# Altium PCB PCB.PcbDoc (part 3 of 9)
Units mil, origin at the board's own origin, x right, y up, seen from the top; angles counter-clockwise.
Board outline 4330.71 x 3149.61 mil, 8 copper layers (L1_TOP, L2_GND, L3_SIG, L4_PWR, L5_PWR, L6_SIG, L7_GND, L8_BOT), stack 62.406 mil thick; 660 components, 433 nets, 2602 pads, 1254 vias.
Unrouted connection lines stored in the file: 930.
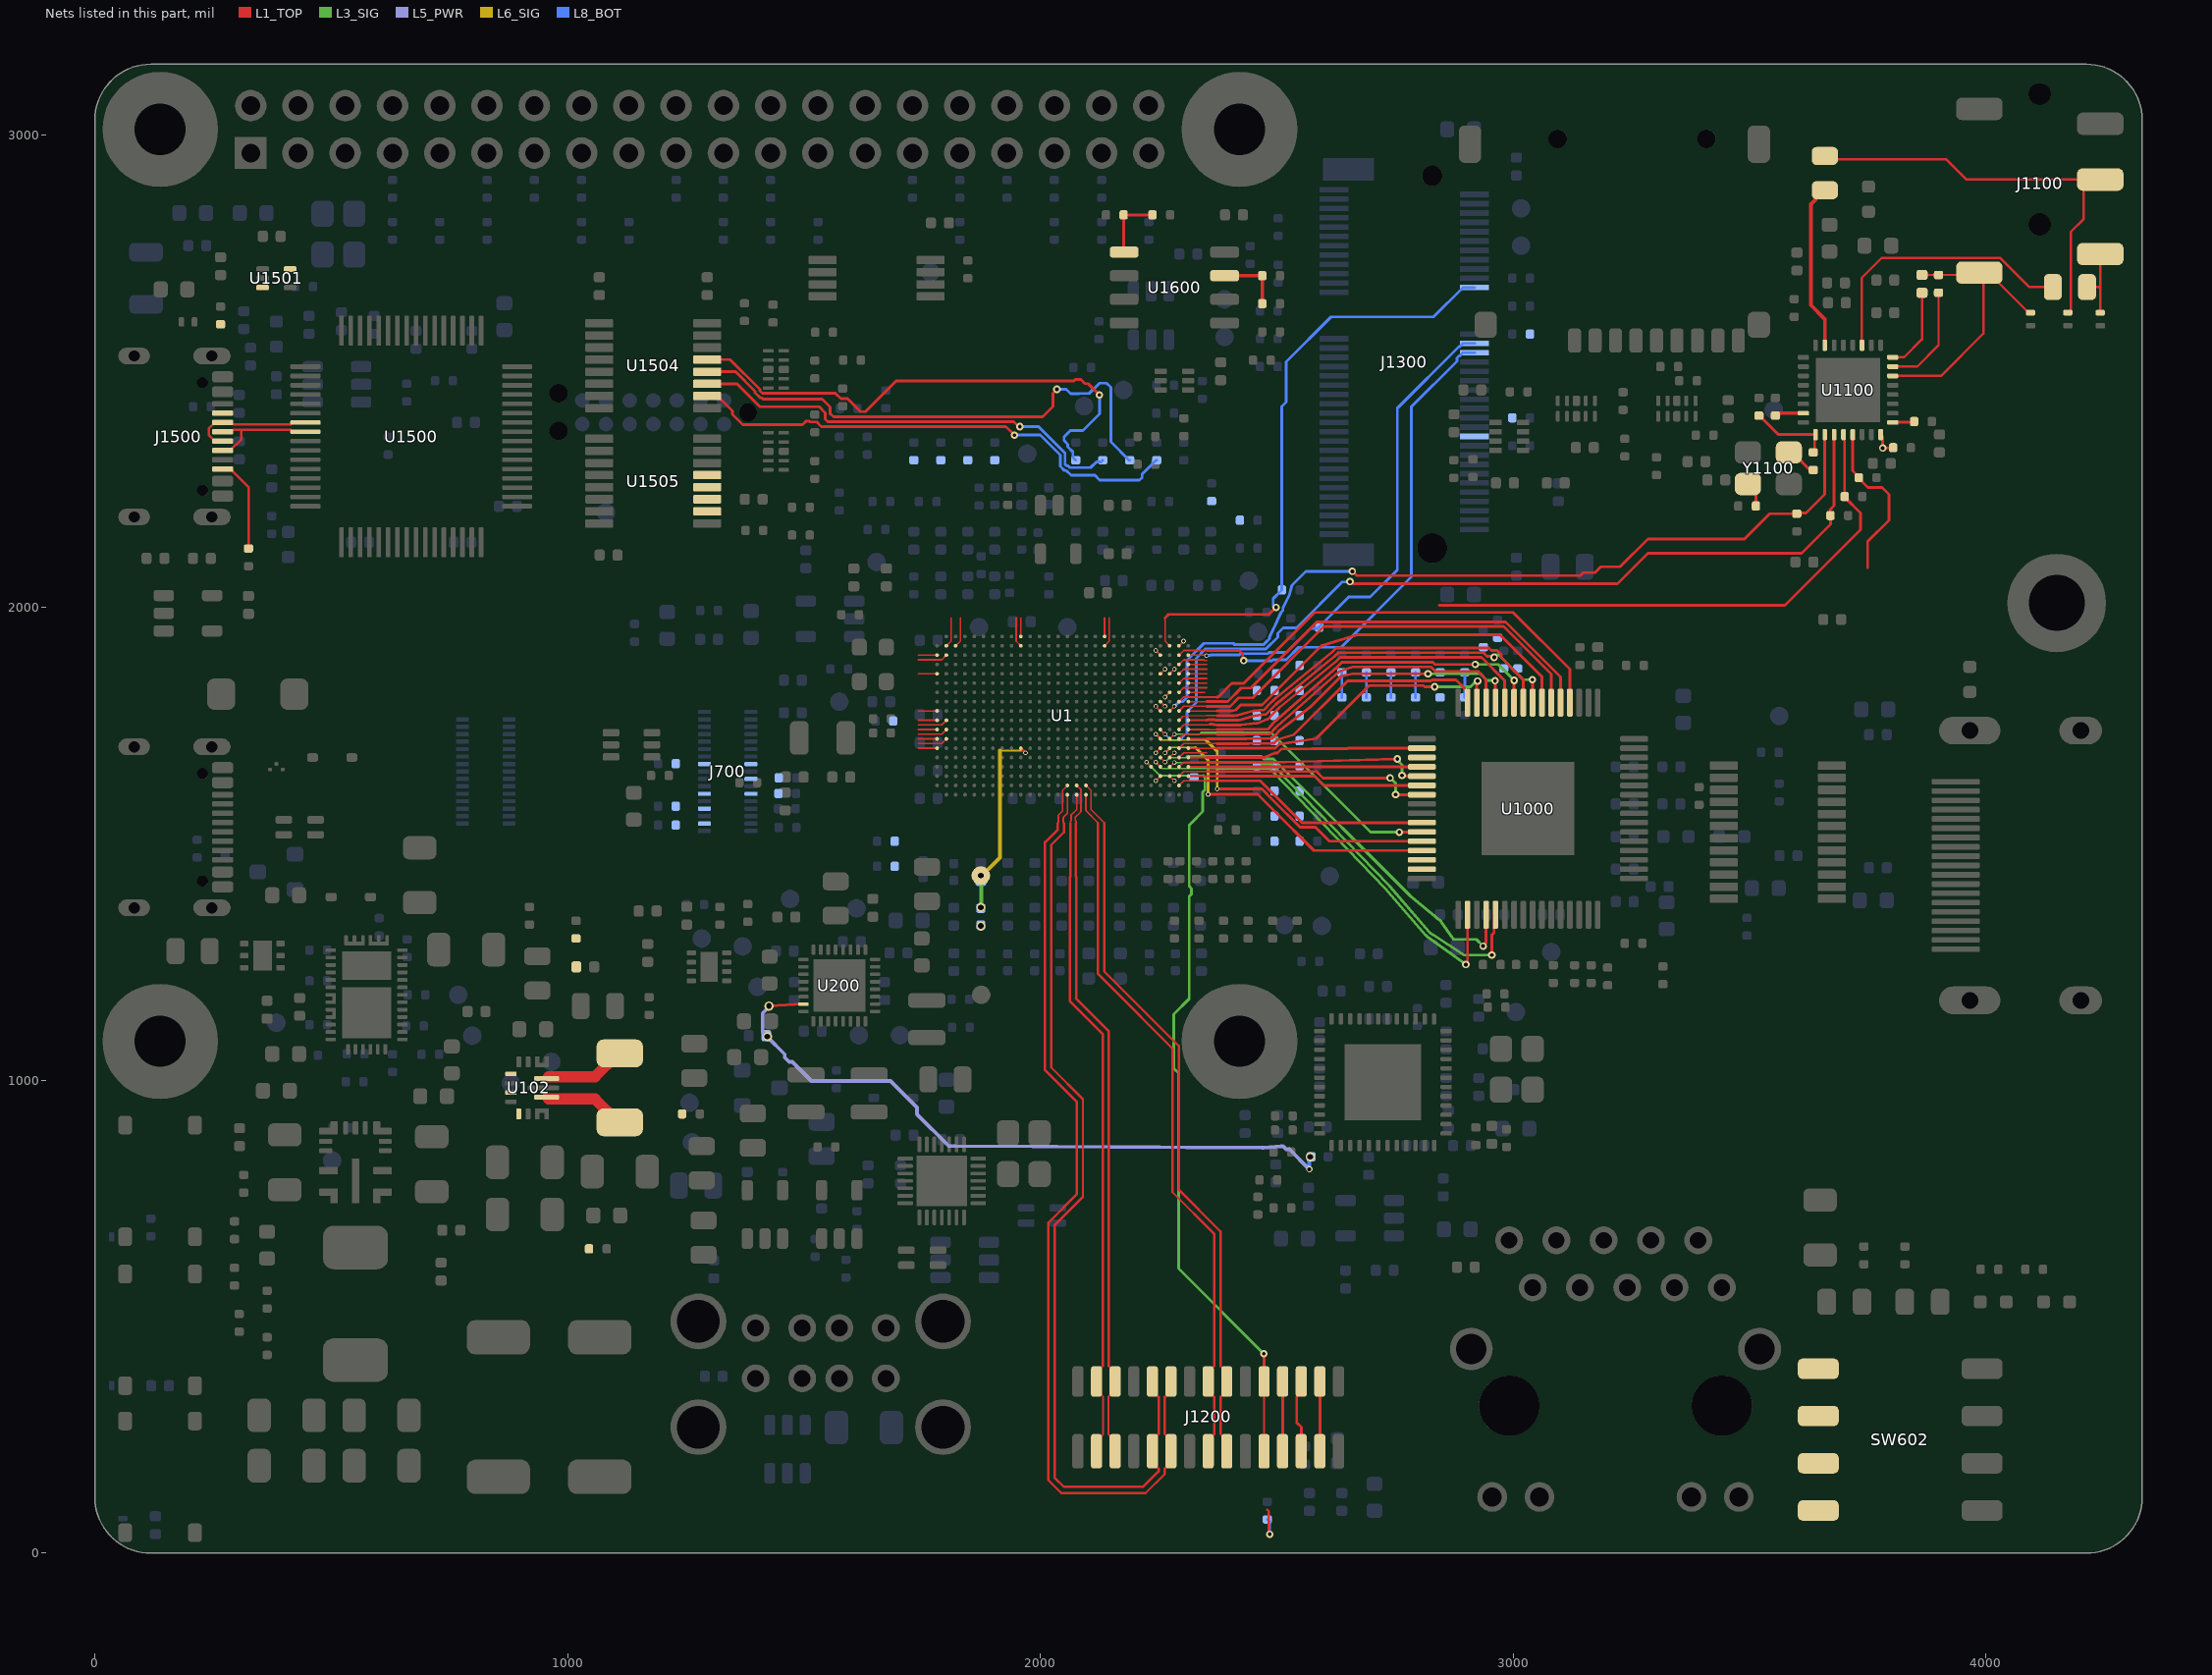
[diagram p7: the nets of this part, all layers, seen from the top]

## Footprints (in the part's own frame and the unit in brackets; to place one, negate y for a bottom-side part, rotate by r counter-clockwise, add the part's x,y. Pads: shape width x height; smd on the part's side, far side on the other; paste and mask are expansions set on the pad) (continued)
WQFN38_REF_4X6 [mm] "TI REF0038A WQFN-38 6x4 mm, 0.4 mm pitch, GND + DRAIN thermal pads (TPS25730D)"
  rrect50% 0.55x0.2 smd: 1(-2.925,1) 2(-2.925,0.6) 3(-2.925,0.2) 4(-2.925,-0.2) 5(-2.925,-0.6) 6(-2.925,-1) 20(2.925,-1.1) 21(2.925,-0.65) 22(2.925,-0.2) 23(2.925,0.2) 24(2.925,0.65) 25(2.925,1.1)
  rrect50% 0.2x0.55 smd: 7(-2.4,-1.925) 8(-2,-1.925) 9(-1.6,-1.925) 10(-1.2,-1.925) 11(-0.8,-1.925) 12(-0.4,-1.925) 13(0,-1.925) 14(0.4,-1.925) 15(0.8,-1.925) 16(1.2,-1.925) 17(1.6,-1.925) 18(2,-1.925) 19(2.4,-1.925) 26(2.4,1.925) 27(2,1.925) 28(1.6,1.925) 29(1.2,1.925) 30(0.8,1.925) 31(0.4,1.925) 32(0,1.925) 33(-0.4,1.925) 34(-0.8,1.925) 35(-1.2,1.925) 36(-1.6,1.925) 37(-2,1.925) 38(-2.4,1.925)
  rrect50% 0.2x1.1 smd: 21(2.75,-0.65) 24(2.75,0.65)
  rrect50% 0.6x0.2 smd: 32(-0.2,1.75) 34(-1,1.75)
  rect 2.72x2.65 smd: 39(-0.965,0)
  rect 1.53x2.65 smd: 40(1.56,0)
  silkscreen extent -3.72,-2 3,2
WSON6_DRV_2X2 [mm] "TI DRV0006A WSON-6 2x2 mm, 0.65 mm pitch, 1.0x1.6 mm thermal pad (TVS2200)"
  rrect33% 0.45x0.3 smd: 1(-0.975,0.65) 2(-0.975,0) 3(-0.975,-0.65) 4(0.975,-0.65) 5(0.975,0) 6(0.975,0.65)
  rect 1x1.6 smd: 7(0,0)
  silkscreen extent -1.72,0.55 -1.52,0.75
WSON8_DSG_2X2 [mm] "TI DSG0008A WSON-8 2x2 mm, 0.5 mm pitch, 0.9x1.6 mm thermal pad (TPS22965)"
  rrect40% 0.5x0.25 smd: 1(-0.95,0.75) 2(-0.95,0.25) 3(-0.95,-0.25) 4(-0.95,-0.75) 5(0.95,-0.75) 6(0.95,-0.25) 7(0.95,0.25) 8(0.95,0.75)
  rect 0.9x1.6 smd: 9(0,0)
  silkscreen extent -1.72,0.65 -1.52,0.85
X1SON2_DPY [mm] "X1SON-2 1.0x0.6 mm (TI DPY0002A), bidirectional, 0.3 x 0.5 mm pads"
  rrect50% 0.3x0.5 smd: 1(-0.35,0) 2(0.35,0)
X2SON3_DMX [mm] "X2SON-3 0.6x1.0 mm (TI DMX0003A), 0.2 mm square pads"
  rrect50% 0.2x0.2 smd: 1(-0.15,0) 2(0.15,-0.34) 3(0.15,0.34)
  silkscreen extent -0.82,-0.1 -0.62,0.1
XTAL_3225_4P [mm] "Crystal 3.2x2.5 mm 4-pad (YXC YSX321SL), 1/3 crystal, 2/4 GND, YXC suggested land"
  rrect50% 1.2x1.4 smd: 1(-0.85,1.1) 2(-0.85,-1.1) 3(0.85,-1.1) 4(0.85,1.1)
  silkscreen extent -1.97,1 -1.77,1.2
XTAL_EPSON_FC-135 [mm] "Epson FC-135 32.768 kHz crystal 3.2x1.5 mm, Epson recommended land"
  rrect50% 1x1.8 smd: 1(-1.25,0) 2(1.25,0)
  silkscreen extent -0.48,-0.75 0.48,0.75

## Part data
C100: library part CAP, "Capacitor, non-polarized", Manufacturer=Samsung, MPN=CL21A475KAQNNNE, Spec="4.7uF 25V X5R 0805 (CVBUS; total VBUS C must stay <= 10 uF)"
C101 C110 C112 C123: library part CAP, "Capacitor, non-polarized", Manufacturer=YAGEO, MPN=CC0603KRX7R9BB104
  C101: Spec="100nF 50V X7R 0603 (VBUS HF)"
  C110: Spec="100nF 50V X7R 0603 (VIN1/PGND1 HF)"
  C112: Spec="100nF 50V X7R 0603 (VIN2/PGND2 HF)"
  C123: Spec="100nF 50V X7R 0603 (VIN HF, at pins)"
C102 C103 C113 C114 C115 C116 C124 C200 C201 C202 C203 C204 C205 C206 C207 C208 C209 C210 C211 C212 C213 C214 C215 C216 C217 C218 C219 C220 C221 C222 C223 C224 C225 C226 C227 C228 C300 C301 C302 C303 C304 C305 C306 C307 C308 C309 C310 C311 C312 C313 C314 C315 C316 C317 C318 C319 C320 C321 C322 C323 C324 C325 C326 C327 C328 C329 C330 C331 C332 C333 C334 C335 C339 C358 C359 C360 C600 C601 C602 C603 C604 C605 C606 C607 C608 C609 C700 C701 C702 C703 C704 C705 C710 C711 C712 C713 C714 C715 C800 C801 C802 C803 C804 C805 C806 C807 C808 C809 C810 C811 C812 C813 C814 C815 C816 C817 C818 C819 C820 C821 C822 C823 C824 C825 C826 C830 C831 C900 C902 C903 C913 C1000 C1001 C1002 C1003 C1004 C1005 C1006 C1007 C1008 C1009 C1010 C1011 C1012 C1013 C1014 C1015 C1016 C1017 C1018 C1019 C1020 C1100 C1101 C1102 C1103 C1104 C1105 C1106 C1107 C1108 C1109 C1110 C1111 C1112 C1113 C1114 C1115 C1200 C1201 C1202 C1203 C1301 C1303 C1404 C1405 C1406 C1407 C1500 C1501 C1502 C1503 C1504 C1505 C1506 C1507 C1508 C1509 C1510 C1511 C1512 C1513 C1514 C1515 C1516 C1517 C1518 C1519 C1520 C1521 C1522 C1523 C1524 C1525 C1600 C1601: library part CAP, "Capacitor, non-polarized"
  C102 C103: Spec="330pF 50V C0G 0402 (CCCy)"
  C113: Spec="1uF 25V X5R 0402 (VCC)"
  C114: Spec="100nF 16V X7R 0402 (at BIAS pin)"
  C115: Spec="100nF 16V X7R 0402 (CBOOT)"
  C116: Spec="4.7pF 50V C0G 0402 (CFF)"
  C124: Spec="100nF 16V X7R 0402 (VAUX)"
  C200: Spec="4.7uF 10V X5R 0603 (PVIN_B1)"
  C201: Spec="100nF 16V X7R 0402 (PVIN_B1)"
  C202: Spec="4.7uF 10V X5R 0603 (PVIN_B2)"
  C203: Spec="4.7uF 10V X5R 0603 (PVIN_B3)"
  C204: Spec="2.2uF 10V X5R 0402 (VSYS)"
  C205: Spec="2.2uF 10V X5R 0402 (PVIN_LDO1)"
  C206: Spec="2.2uF 10V X5R 0402 (PVIN_LDO2)"
  C207: Spec="4.7uF 10V X5R 0603 (PVIN_LDO34)"
  C208: Spec="2.2uF 10V X5R 0402 (VDD1P8, no load)"
  C209: Spec="22uF 6.3V X5R 0805 (bulk)"
  C210 C211: Spec="22uF 6.3V X5R 0805 (Buck1 out)"
  C212 C213: Spec="22uF 6.3V X5R 0805 (Buck2 out)"
  C214 C215: Spec="22uF 6.3V X5R 0805 (Buck3 out)"
  C216: Spec="2.2uF 10V X5R 0402 (LDO1 out)"
  C217: Spec="2.2uF 10V X5R 0402 (LDO2 out, unused)"
  C218: Spec="2.2uF 10V X5R 0402 (LDO3 out)"
  C219: Spec="2.2uF 10V X5R 0402 (LDO4 out)"
  C220: Spec="47pF 50V C0G 0402"
  C221: Spec="220pF 50V C0G 0402 (CT: IO supply slew)"
  C222: Spec="2.2uF 10V X5R 0402 (VIN)"
  C223: Spec="10uF 10V X5R 0603 (VOUT)"
  C224: Spec="100nF 16V X7R 0402 (VOUT)"
  C225: DNP=1, Spec="1uF 10V X5R 0402 (VPP LDO in, DNP)"
  C226: DNP=1, Spec="2.2uF 10V X5R 0402 (VPP LDO out, DNP)"
  C227: Spec="1uF 10V X5R 0402 (PHY LDO in)"
  C228: Spec="1uF 10V X5R 0402 (PHY LDO out)"
  C300: Spec="22pF 50V C0G 0402 (C1)"
  C301: Spec="10uF 10V X5R 0603"
  C302 C303 C304 C305 C306 C307 C309 C311 C314 C315 C316 C317 C318 C319 C320 C321 C323 C325 C327 C329 C331 C333 C335 C1501: Spec="100nF 16V X7R 0402"
  C308 C310 C330 C332: Spec="4.7uF 10V X5R 0402"
  C312: Spec="4.7uF 10V X5R 0402 (VDD_CANUART ball)"
  C313: Spec="100nF 16V X7R 0402 (VDD_CANUART ball)"
  C322 C324 C326 C328 C334: Spec="1uF 10V X5R 0402"
  C339: Spec="100nF 16V X7R 0402 (VDDA_3P3_USB)"
  C358 C359: DNP=1, Spec="1uF 10V X5R 0402 (VPP, DNP)"
  C360: DNP=1, Spec="100nF 16V X7R 0402 (VPP, DNP)"
  C600: Spec="10nF 50V X7R 0402 (osc VDD)"
  C601: Spec="1uF 10V X5R 0402 (osc VDD)"
  C602: Spec="18pF 50V C0G 0402 (Cf1)"
  C603: Spec="18pF 50V C0G 0402 (Cf2)"
  C604: Spec="100nF 16V X7R 0402 (U601 VCC)"
  C605: Spec="22pF 50V C0G 0402 (glitch filter at ball D6)"
  C606 C607: Spec="100nF 16V X7R 0402 (debounce)"
  C608: Spec="100nF 16V X7R 0402 (U602 VCC)"
  C609: Spec="22pF 50V C0G 0402 (glitch filter at ball D17)"
  C700: Spec="10uF 10V X5R 0603 (VCC)"
  C701: Spec="100nF 16V X7R 0402 (VCC)"
  C702: Spec="4.7uF 10V X5R 0603 (VCCQ)"
  C703: Spec="100nF 16V X7R 0402 (VCCQ pin 20)"
  C704: Spec="100nF 16V X7R 0402 (VCCQ pin 21)"
  C705: Spec="100nF 16V X7R 0402 (U703 VCC)"
  C710: Spec="1uF 25V X5R 0402 (VIN1)"
  C711: Spec="1uF 25V X5R 0402 (VIN2)"
  C712: Spec="100nF 16V X7R 0402 (VBIAS)"
  C713: Spec="2.2uF 10V X5R 0402 (card VDD)"
  C714: Spec="100nF 16V X7R 0402 (card VDD)"
  C715: Spec="100nF 16V X7R 0402 (VOUT2)"
  C800 C801: Spec="15pF 50V C0G 0402"
  C802: DNP=1, Spec="22pF 50V C0G 0402 (DNP, SK compliance option)"
  C803: Spec="10uF 10V X5R 0603 (VDDIO bulk)"
  C804: Spec="10nF 25V X7R 0402 (VDDIO bulk)"
  C805: Spec="1uF 25V X5R 0402 (pin 19)"
  C806: Spec="100nF 16V X7R 0402 (pin 19)"
  C807: Spec="1uF 25V X5R 0402 (pin 30)"
  C808: Spec="100nF 16V X7R 0402 (pin 30)"
  C809: Spec="1uF 25V X5R 0402 (pin 41)"
  C810: Spec="100nF 16V X7R 0402 (pin 41)"
  C811: Spec="10uF 10V X5R 0603 (VDDA2P5 bulk)"
  C812: Spec="10nF 25V X7R 0402 (VDDA2P5 bulk)"
  C813: Spec="1uF 25V X5R 0402 (pin 3)"
  C814: Spec="100nF 16V X7R 0402 (pin 3)"
  C815: Spec="1uF 25V X5R 0402 (pin 9)"
  C816: Spec="100nF 16V X7R 0402 (pin 9)"
  C817: Spec="10uF 10V X5R 0603 (VDD1P0 bulk)"
  C818: Spec="10nF 25V X7R 0402 (VDD1P0 bulk)"
  C819: Spec="1uF 25V X5R 0402 (pin 6)"
  C820: Spec="100nF 16V X7R 0402 (pin 6)"
  C821: Spec="1uF 25V X5R 0402 (pin 24)"
  C822: Spec="100nF 16V X7R 0402 (pin 24)"
  C823: Spec="1uF 25V X5R 0402 (pin 31)"
  C824: Spec="100nF 16V X7R 0402 (pin 31)"
  C825: Spec="1uF 25V X5R 0402 (pin 42)"
  C826: Spec="100nF 16V X7R 0402 (pin 42)"
  C830: Spec="100nF 16V X7R 0402 (centre tap)"
  C831: DNP=1, Spec="1nF 2kV X7R 1206 (DNP, AC-coupled shield option)"
  C900: Spec="1uF 10V X5R 0402 (V5 pin 26)"
  C902: Spec="10uF 10V X5R 0603 (VDD33 pin 28)"
  C903: Spec="1uF 10V X5R 0402 (VDD33 pin 28)"
  C913: DNP=1, Spec="4.7nF 2kV X7R 1206 DNP (SK C372 option)"
  C1000: Spec="10uF 10V X5R 0603 (DVDD pins 1/12/33)"
  C1001 C1002 C1003 C1004: Spec="100nF 16V X7R 0402 (DVDD pins 1/12/33)"
  C1005: Spec="10uF 10V X5R 0603 (PVDD pin 18)"
  C1006 C1007 C1008 C1009: Spec="100nF 16V X7R 0402 (PVDD pin 18)"
  C1010: Spec="10uF 10V X5R 0603 (TVDD pins 23/29)"
  C1011 C1012 C1013 C1014: Spec="100nF 16V X7R 0402 (TVDD pins 23/29)"
  C1015: Spec="100nF 16V X7R 0402 (TPD VCCA)"
  C1016: Spec="10uF 10V X5R 0603 (TPD VCCA bulk, SK)"
  C1017: Spec="100nF 16V X7R 0402 (TPD VCC5V)"
  C1018: Spec="10uF 10V X5R 0603 (TPD VCC5V bulk, SK)"
  C1019: Spec="100nF 16V X7R 0402 (5V_OUT)"
  C1020: Spec="10uF 10V X5R 0603 (5V_OUT bulk, SK)"
  C1100: Spec="10uF 10V X5R 0603 (bulk after bead)"
  C1101: Spec="100nF 16V X7R 0402 (AVDD pin 25)"
  C1102: Spec="1uF 16V X5R 0402 (AVDD pin 25)"
  C1103: Spec="100nF 16V X7R 0402 (DRVDD pin 18)"
  C1104: Spec="100nF 16V X7R 0402 (DRVDD pin 24)"
  C1105: Spec="1uF 16V X5R 0402 (DRVDD)"
  C1106: Spec="10uF 10V X5R 0603 (DRVDD)"
  C1107: Spec="100nF 16V X7R 0402 (IOVDD pin 7)"
  C1108: Spec="1uF 16V X5R 0402 (IOVDD pin 7)"
  C1109: Spec="100nF 16V X7R 0402 (DVDD pin 32)"
  C1110: Spec="1uF 16V X5R 0402 (DVDD pin 32)"
  C1111: Spec="47uF 6.3V X5R 0805 (HP L coupling)"
  C1112: Spec="47uF 6.3V X5R 0805 (HP R coupling)"
  C1113: Spec="0.47uF 16V X7R 0402 (mic AC coupling)"
  C1114: Spec="100nF 16V X7R 0402 (Y1100 VDD)"
  C1115: Spec="1uF 16V X5R 0402 (Y1100 VDD)"
  C1200: Spec="10uF 10V X5R 0603 (bulk at J1200, SK C43)"
  C1201: Spec="1uF 16V X5R 0402"
  C1202: Spec="100nF 16V X7R 0402 (at pin 15, SK C45)"
  C1203: Spec="100nF 16V X7R 0402 (bead input)"
  C1301: Spec="10uF 10V X5R 0603 (pins 2/4)"
  C1303: Spec="10uF 10V X5R 0603 (pins 72/74)"
  C1404: DNP=1, Spec="100nF 16V X7R 0402 (EEPROM, DNP)"
  C1405: Spec="10uF 10V X5R 0603 (header 5V)"
  C1406: Spec="10uF 10V X5R 0603 (header 3V3)"
  C1407: Spec="100nF 16V X7R 0402 (header 3V3)"
  C1500: Spec="4.7uF 10V X5R 0603 (VBUS; total <= 10uF)"
  C1502: Spec="100nF 16V X7R 0402 (TPD2E001 VCC)"
  C1503: Spec="1uF 10V X5R 0402 (LDO in)"
  C1504: Spec="2.2uF 10V X5R 0402 (LDO out)"
  C1505: Spec="100nF 16V X7R 0402 (LDO out)"
  C1506: Spec="10uF 10V X5R 0603 (VREGOUT, >= 3.3uF effective)"
  C1507: Spec="100nF 16V X7R 0402 (VCORE 12)"
  C1508: Spec="100nF 16V X7R 0402 (VCORE 37)"
  C1509: Spec="100nF 16V X7R 0402 (VCORE 64)"
  C1510: Spec="100nF 16V X7R 0402 (VREGIN)"
  C1511: Spec="100nF 16V X7R 0402 (VCCIO 20)"
  C1512: Spec="100nF 16V X7R 0402 (VCCIO 31)"
  C1513: Spec="100nF 16V X7R 0402 (VCCIO 42)"
  C1514: Spec="100nF 16V X7R 0402 (VCCIO 56)"
  C1515: Spec="4.7uF 10V X5R 0402 (VPHY)"
  C1516: Spec="100nF 16V X7R 0402 (VPHY)"
  C1517: Spec="4.7uF 10V X5R 0402 (VPLL)"
  C1518: Spec="100nF 16V X7R 0402 (VPLL)"
  C1519 C1520: Spec="33pF 50V C0G 0402 (CL 20pF crystal)"
  C1521: Spec="100nF 16V X7R 0402 (EEPROM)"
  C1522: Spec="100nF 16V X7R 0402 (U1504 VCCA)"
  C1523: Spec="100nF 16V X7R 0402 (U1504 VCCB)"
  C1524: Spec="100nF 16V X7R 0402 (U1505 VCCA)"
  C1525: Spec="100nF 16V X7R 0402 (U1505 VCCB)"
  C1600: Spec="100nF 16V X7R 0402 (U1600 VCC)"
  C1601: Spec="10nF 50V X7R 0402 (U1601 V+, DS 7.3)"
C104 C105 C106 C128: library part CAP, "Capacitor, non-polarized", Manufacturer=Samsung, MPN=CL10A106KP8NNNC
  C104: Spec="10uF 10V X5R 0603 (CVIN_3V3)"
  C105: Spec="10uF 10V X5R 0603 (CLDO_3V3 5-25uF)"
  C106: Spec="10uF 10V X5R 0603 (CLDO_1V5 4.5-12uF)"
  C128: Spec="10uF 10V X5R 0603 (VOUT bypass at pins)"
C107 C108 C125 C126 C127: library part CAP, "Capacitor, non-polarized", Manufacturer=Samsung, MPN=CL31A226KAHNNNE
  C107 C108: Spec="22uF 25V X5R 1206 (CPPHV bulk)"
  C125 C126 C127: Spec="22uF 25V X5R 1206 (COUT)"
C109 C111: library part CAP, "Capacitor, non-polarized", Manufacturer=Samsung, MPN=CL31A106KBHNNNE
  C109: Spec="10uF 50V X5R 1206 (VIN1/PGND1)"
  C111: Spec="10uF 50V X5R 1206 (VIN2/PGND2)"
C117 C118 C119 C120: library part CAP, "Capacitor, non-polarized", Manufacturer=Samsung, MPN=CL31A476MPHNNNE, Spec="47uF 10V X5R 1206 (COUT)"
C121 C122: library part CAP, "Capacitor, non-polarized", Manufacturer=Samsung, MPN=CL21A106KAYNNNE, Spec="10uF 25V X5R 0805 (CIN)"
C901 C904 C906 C908 C910 C912 C1302 C1304 C1305: library part CAP, "Capacitor, non-polarized", LCSC=C1525, Manufacturer=Samsung, MPN=CL05B104KO5NNNC
  C901: Spec="100nF 16V X7R 0402 (V5 pin 26)"
  C904: Spec="100nF 16V X7R 0402 (VDD33 pin 28)"
  C906 C910: Spec="100nF 16V X7R 0402 (switch IN)"
  C908 C912: Spec="100nF 16V X7R 0402 (at connector)"
  C1302: Spec="100nF 16V X7R 0402 (pins 2/4)"
  C1304: Spec="100nF 16V X7R 0402 (pins 72/74)"
  C1305: Spec="100nF 16V X7R 0402 (pin 64)"
C905 C909: library part CAP, "Capacitor, non-polarized", LCSC=C15850, Manufacturer=Samsung, MPN=CL21A106KAYNNNE, Spec="10uF 25V X5R 0805 (switch IN)"
C907 C911: library part CAP_POL, "Capacitor, polarized (pin 1 = +)", LCSC=C48970647, Manufacturer="Honor Elec", MPN=RYHV10V150UF6*5, Spec="150uF 10V polymer (USB 2.0 >= 120 uF)"
C1300: library part CAP, "Capacitor, non-polarized", LCSC=C45783, Manufacturer=Samsung, MPN=CL21A226MAQNNNE, Spec="22uF 25V X5R 0805 (bulk)"
C1400 C1401 C1402 C1403: library part CAP, "Capacitor, non-polarized", Manufacturer=FH, MPN=0402CG470J500NT, Spec="47pF 50V C0G 0402 (I2C slew limiter)"
D100: library part TVS2200_DRV, "TVS2200 22 V flat-clamp surge protection, WSON-6 2x2", Manufacturer="Texas Instruments", MPN=TVS2200DRVR
D101 D102: library part TVS_BI, "Bidirectional TVS / ESD diode", Manufacturer=Nexperia, MPN=PESD24VL1BA,115
  D101: Spec="PESD24VL1BA CC1 ESD (11pF)"
  D102: Spec="PESD24VL1BA CC2 ESD (11pF)"
D103: library part DIODE, "Diode (pin 1 = anode)", Manufacturer=MDD, MPN=SS34, Spec="SS34 40V 3A Schottky (TPS25730 DS 8.5)"
D200: library part TVS_BI, "Bidirectional TVS / ESD diode", Spec="TPD1E10B06 ESD"
D600 D601 D1100 D1101 D1102 D1500: library part TVS_BI, "Bidirectional TVS / ESD diode", Manufacturer="Texas Instruments", MPN=TPD1E10B06DPYR
  D1100: Spec="TPD1E10B06DPYR (tip, at J1100)"
  D1101: Spec="TPD1E10B06DPYR (ring 1, at J1100)"
  D1102: Spec="TPD1E10B06DPYR (sleeve, at J1100)"
D900: library part ESD122_DMX, "ESD122 2-channel 0.2 pF bidirectional ESD diode, X2SON-3 (DMX)", LCSC=C544474, Manufacturer="Texas Instruments", MPN=ESD122DMXR
D901 D903: library part BZX84_SOT23, "Zener diode SOT-23 (1 = anode, 2 = NC, 3 = cathode)", LCSC=C12746, Manufacturer=LRC, MPN=LBZX84C6V8LT1G, Spec="LBZX84C6V8LT1G 6.8V"
D902: library part DIODE, "Diode (pin 1 = anode)", LCSC=C124205, Manufacturer="Diodes Inc", MPN=BAT54WS-7-F, Spec="BAT54WS-7-F (anode at hub)"
D904 D905: "USBLC6-2 2-line USB ESD array with VBUS clamp, SOT23-6L", LCSC=C7519, Manufacturer=STMicroelectronics, MPN=USBLC6-2SC6
F1400: library part PTC_BSMD1206, "PTC resettable fuse, 1206, not polarized", Manufacturer=BHFUSE, MPN=BSMD1206-110-6V
FB300 FB301 FB302 FB303 FB304 FB305 FB306 FB307 FB308 FB309 FB310 FB311: library part FERRITE, "Ferrite bead"
  FB300 FB301: Spec="BLM18SG260TN1D 26R@100MHz 6A"
  FB302 FB303 FB304 FB305 FB306 FB307 FB308 FB309: Spec="BLM15PX121SN1D 120R@100MHz 2A"
  FB310: Spec="BLM15PX121SN1D 120R@100MHz 2A (VDDS_OSC0, 25 MHz osc, PORz gate)"
  FB311: Spec="BLM15PX121SN1D 120R@100MHz 2A (62_POWER_4 group 5)"
FB800 FB1000 FB1001 FB1002 FB1003 FB1100 FB1200 FB1500 FB1501: library part FERRITE, "Ferrite bead", Manufacturer=Murata
  FB800: MPN=BLM15PX121SN1D, Spec="BLM15PX121SN1D 120R@100MHz 2A"
  FB1000: MPN=BLM18KG601SN1D, Spec="BLM18KG601SN1D 600R@100MHz 1.3A 0603 (DVDD)"
  FB1001: MPN=BLM18KG601SN1D, Spec="BLM18KG601SN1D 600R@100MHz 1.3A 0603 (PVDD)"
  FB1002: MPN=BLM18KG601SN1D, Spec="BLM18KG601SN1D 600R@100MHz 1.3A 0603 (TVDD)"
  FB1003: MPN=BLM18PG121SN1D, Spec="BLM18PG121SN1D 120R@100MHz 0603 (shell to GND, SK FL17)"
  FB1100: MPN=BLM18KG601SN1D, Spec="BLM18KG601SN1D 600R@100MHz 1.3A 0603 (codec analog 3.3 V)"
  FB1200: MPN=BLM18KG601SN1D, Spec="BLM18KG601SN1D 600R@100MHz 1.3A 0603 (camera 3.3 V)"
  FB1500: MPN=BLM18PG121SN1D, Spec="BLM18PG121SN1D 120R@100MHz (VPHY)"
  FB1501: MPN=BLM18PG121SN1D, Spec="BLM18PG121SN1D 120R@100MHz (VPLL)"
H1300: library part MOUNTING_HOLE, "Plated mounting hole (pin to GND)", LCSC=C22431324, Manufacturer="Wurth Elektronik", MPN=9774015243R
H1600 H1601 H1602 H1603: library part MOUNTING_HOLE, "Plated mounting hole (pin to GND)"
J100: "USB Type-C receptacle, USB 2.0 16-contact, SMD R/A, 4 THT shell pegs", Manufacturer="Korean Hroparts Elec", MPN=TYPE-C-31-M-12
J700: library part GB042-34P-H10, "eMMC-module connector, LS Mtron GB042 34-pin 0.4 mm B2B plug (Odroid/Radxa/PINE64 pinout)", Manufacturer="LS Mtron", MPN=GB042-34P-H10-E3000, Supplier="broker, consigned to JLC (STOCK RISK)"
J701: library part GB042-30P-H10, "eMMC-module retention connector, LS Mtron GB042 30-pin 0.4 mm B2B plug (mechanical, all GND)", Manufacturer="LS Mtron", MPN=GB042-30P-H10-E3000, DNP=1
J702: "microSD push-push socket with card-detect switch (Hroparts TF-01A)", LCSC=C91145, Manufacturer="Korean Hroparts Elec", MPN=TF-01A
J800: "RJ45 MagJack, 1000BASE-T 1CT:1CT magnetics, green/yellow LEDs, shielded (HanRun HR911130A)", LCSC=C54408, Manufacturer=HanRun, MPN=HR911130A
J900: library part BX-TYPE-A-MWC44, "Dual stacked USB 2.0 Type-A receptacle, THT right angle (Bossie BX-TYPE-A-MWC44)", Manufacturer="Wurth Elektronik", MPN=61400826021, Supplier="Mouser 710-61400826021"
J1000: library part HDMI_A_RECEPT, "HDMI type-A receptacle, 19 pin + shell (XFCN HDMI-A-19F-S-D)", Manufacturer=XFCN, MPN=HDMI-A-19F-S-D
J1100: library part JACK_TRRS_PJ320DB, "3.5 mm TRRS jack, SMD, no switch (PJ-320DB-5A)", Manufacturer="Korean Hroparts Elec", MPN=PJ-320DB-5A
J1200: library part FPC15_RPI_CSI, "15-pin 1.0 mm FPC, Raspberry Pi camera pinout (TE 1-1734248-5)", Manufacturer="TE Connectivity", MPN=1-1734248-5
J1300: "M.2 Key-E socket, 67 contacts 0.5 mm, H3.2, 2 SMT tabs (LOTES APCI0085-P002A)", LCSC=C841649, Manufacturer=LOTES, MPN=APCI0085-P002A
J1400: library part HDR_2X20_2541WV, "Pin header 2x20 2.54 mm, Raspberry Pi 40-pin numbering", Manufacturer=HanElectricity, MPN=2541WV-2x20P
J1500: "USB Type-C receptacle, USB 2.0 16-contact, SMD R/A, 4 THT shell pegs", Manufacturer="Korean Hroparts (HRO)", MPN=TYPE-C-31-M-12
J1501: library part TC2070_TI14, "Tag-Connect TC2070-NL footprint, TI 14-pin JTAG pinout (pad 6 = KEY)", Manufacturer=Tag-Connect, MPN=TC2070-NL-FP, DNP=1
L100: library part IND, "Inductor", Manufacturer=Sunlord, MPN=MWSA0603S-4R7MT, Spec="4.7uH MWSA0603S-4R7MT (Isat 9A, 33mOhm)"
L101: library part IND, "Inductor", Manufacturer=Sunlord, MPN=MWSA0402S-1R5MT, Spec="1.5uH MWSA0402S-1R5MT (Isat 5.5A)"
L200 L201 L202: library part IND, "Inductor", Manufacturer=Murata, MPN=DFE252012F-R47M=P2
  L200: Spec="0.47uH DFE252012F-R47M (Buck1, Isat 6.7A)"
  L201: Spec="0.47uH DFE252012F-R47M (Buck2)"
  L202: Spec="0.47uH DFE252012F-R47M (Buck3)"
L900 L901 L902: library part SDCW2012-2, "Sunlord SDCW2012-2 wire-wound 2-line common-mode choke, 0805", LCSC=C54888, Manufacturer=Sunlord, MPN=SDCW2012-2-900TF, Spec="SDCW2012-2-900TF 90R@100MHz"
LED1600 LED1601 LED1602 LED1603: library part LED, "LED (pin 1 = anode)", Manufacturer="Hubei KENTO"
  LED1600: MPN=KT-0805G, Spec="KT-0805G green (3V3)"
  LED1601: MPN=KT-0805G, Spec="KT-0805G green (USER_LED1 heartbeat)"
  LED1602: MPN=KT-0603R, Spec="KT-0603R red (USER_LED2)"
  LED1603: MPN=KT-0603R, Spec="KT-0603R red (VCC_5V0)"
R100 R101 R102 R103 R104 R105 R106 R107 R108 R109 R110 R111 R112 R113 R114 R115 R117 R118 R119 R120 R121 R122 R123 R124 R125 R200 R201 R202 R203 R204 R205 R206 R208 R209 R210 R600 R601 R603 R604 R605 R606 R607 R608 R609 R610 R611 R612 R613 R620 R621 R622 R623 R624 R625 R626 R627 R628 R629 R630 R631 R632 R633 R634 R635 R636 R637 R638 R639 R640 R641 R642 R643 R644 R645 R646 R647 R648 R649 R650 R651 R700 R701 R702 R703 R704 R705 R706 R707 R708 R709 R710 R711 R712 R713 R720 R721 R722 R723 R724 R725 R726 R727 R728 R730 R731 R732 R800 R801 R802 R803 R804 R805 R806 R807 R808 R809 R810 R811 R812 R813 R814 R815 R820 R821 R822 R823 R840 R841 R902 R903 R904 R905 R906 R907 R908 R909 R910 R911 R912 R913 R1000 R1001 R1002 R1003 R1004 R1005 R1006 R1007 R1008 R1009 R1010 R1011 R1012 R1013 R1014 R1015 R1016 R1100 R1101 R1102 R1103 R1104 R1105 R1106 R1107 R1108 R1109 R1110 R1111 R1112 R1200 R1201 R1202 R1312 R1316 R1319 R1428 R1429 R1430 R1431 R1432 R1433 R1500 R1501 R1503 R1504 R1505 R1507 R1508 R1509 R1510 R1511 R1512 R1513 R1514 R1515 R1516 R1517 R1518 R1520 R1521 R1522 R1523 R1524 R1525 R1526 R1527 R1528 R1529 R1600 R1601 R1602 R1603 R1604 R1605 R1606 R1607 R1608 R1609 R1610 R1620 R1621: library part RES, "Resistor"
  R100: Spec="100k 1% 0402 (ADCIN2 up)"
  R101: Spec="4.99k 1% 0402 (ADCIN2 dn: max 9V)"
  R102: Spec="100k 1% 0402 (ADCIN3 up)"
  R103: Spec="4.99k 1% 0402 (ADCIN3 dn: 1.5A op)"
  R104 R105 R106: Spec="10k 1% 0402 (RESERVED)"
  R107: Spec="10k 1% 0402 (FAULT_IN high = no fault)"
  R108: Spec="10k 1% 0402 (SoC-side pull-up)"
  R109 R110 R111 R112: Spec="100k 1% 0402"
  R113: Spec="100k 1% 0402 (RENT)"
  R114: Spec="43.2k 1% 0402 (RENB: UVLO on 4.19V, off 3.0V)"
  R115: Spec="33.2k 1% 0402 (RT: 400kHz)"
  R117: Spec="100k 1% 0402 (RFBT)"
  R118: Spec="43.2k 1% 0402 (RFBB: 3.315V)"
  R119: Spec="1k 1% 0402 (RFF)"
  R120: Spec="100k 1% 0402 (PGOOD pull-up)"
  R121: Spec="100k 1% 0402 (EN: on with 3V3_MAIN)"
  R122: Spec="100k 1% 0402 (PS high: power save)"
  R123: Spec="680k 1% 0402 (R1)"
  R124: Spec="130k 1% 0402 (R2: 4.985V)"
  R125: Spec="100k 1% 0402 (PG pull-up)"
  R200 R202: Spec="10k 0402"
  R201: Spec="2.2k 0402 (fast edge into the MCU_PORz gate, sheet 06)"
  R203: Spec="62R 0402 (slew limiter, SK rev B)"
  R204: Spec="10k 0402 (SD starts at 3.3 V)"
  R205: Spec="10k 0402 (GPO2 is open drain)"
  R206: Spec="100k 0402 (keeps VPP off)"
  R208: Spec="10k 0402 (MODE/STBY high = ACTIVE + forced PWM, SK R621)"
  R209: Spec="10k 0402 (MODE/RESET high = no reset)"
  R210: Spec="10k 0402 (Octavo 62_CONFIG_9: to the VDDSHV_CANUART source)"
  R600: Spec="22R 1% 0402 (series term. at the oscillator)"
  R601: Spec="10k 1% 0402 (OE pull-up, SK R370)"
  R603: DNP=1, Spec="10M 1% 0402 (Rbias option, DS Fig 6-21 gives no value)"
  R604: Spec="10k 1% 0402 (gate enabled with no debugger)"
  R605: Spec="10k 1% 0402 (spare input high)"
  R606: Spec="4.7k 1% 0402 (SK R201; holds PORz low when U601 is unpowered)"
  R607 R608 R904 R912 R1508 R1509 R1510 R1523 R1524 R1525 R1526 R1527: Spec="10k 1% 0402"
  R609: Spec="10k 1% 0402 (Octavo 62_RESET_6)"
  R610: Spec="10k 1% 0402 (Octavo 62_CONFIG_4, 62_RESET_4)"
  R611: Spec="10k 1% 0402 (RESETSTATz pull-down, as SK; SoC load 0.33 mA)"
  R612: Spec="10k 1% 0402 (holds peripherals in reset)"
  R613: Spec="10k 1% 0402 (DS Table 5-74: pull-down)"
  R620: Spec="10k 1% 0402 (B0 = 1: PLL ref 011 = 25 MHz)"
  R621: DNP=1, Spec="10k 1% 0402 DNP (B0 = 1: PLL ref 011 = 25 MHz)"
  R622: Spec="10k 1% 0402 (B1 = 1: PLL ref)"
  R623: DNP=1, Spec="10k 1% 0402 DNP (B1 = 1: PLL ref)"
  R624: DNP=1, Spec="10k 1% 0402 DNP (B2 = 0: PLL ref)"
  R625: Spec="10k 1% 0402 (B2 = 0: PLL ref)"
  R626: DNP=1, Spec="10k 1% 0402 DNP (B7 = 0: MMCSD FS/raw: 0 = FAT)"
  R627: Spec="10k 1% 0402 (B7 = 0: MMCSD FS/raw: 0 = FAT)"
  R628: DNP=1, Spec="10k 1% 0402 DNP (B8 = 0: rsvd for MMCSD)"
  R629: Spec="10k 1% 0402 (B8 = 0: rsvd for MMCSD)"
  R630: Spec="10k 1% 0402 (B9 = 1: MMCSD port: 1 = MMC1 (SD))"
  R631: DNP=1, Spec="10k 1% 0402 DNP (B9 = 1: MMCSD port: 1 = MMC1 (SD))"
  R632: Spec="10k 1% 0402 (B10 = 1: backup 001 = USB)"
  R633: DNP=1, Spec="10k 1% 0402 DNP (B10 = 1: backup 001 = USB)"
  R634: DNP=1, Spec="10k 1% 0402 DNP (B11 = 0: backup)"
  R635: Spec="10k 1% 0402 (B11 = 0: backup)"
  R636: DNP=1, Spec="10k 1% 0402 DNP (B12 = 0: backup)"
  R637: Spec="10k 1% 0402 (B12 = 0: backup)"
  R638: DNP=1, Spec="10k 1% 0402 DNP (B13 = 0: backup USB mode: 0 = DFU)"
  R639: Spec="10k 1% 0402 (B13 = 0: backup USB mode: 0 = DFU)"
  R640: DNP=1, Spec="10k 1% 0402 DNP (B14 = 0: reserved)"
  R641: Spec="10k 1% 0402 (B14 = 0: reserved)"
  R642: DNP=1, Spec="10k 1% 0402 DNP (B15 = 0: reserved)"
  R643: Spec="10k 1% 0402 (B15 = 0: reserved)"
  R644: Spec="1k 1% 0402 (DIP pos 1 ON -> B3 = 1)"
  R645: Spec="47k 1% 0402 (B3 OFF = 0)"
  R646: Spec="1k 1% 0402 (DIP pos 2 ON -> B4 = 1)"
  R647: Spec="47k 1% 0402 (B4 OFF = 0)"
  R648: Spec="1k 1% 0402 (DIP pos 3 ON -> B5 = 1)"
  R649: Spec="47k 1% 0402 (B5 OFF = 0)"
  R650: Spec="1k 1% 0402 (DIP pos 4 ON -> B6 = 0)"
  R651: Spec="47k 1% 0402 (B6 OFF = 1)"
  R700: Spec="22R 0402 (at SoC; 0R option)"
  R701 R702 R703 R704 R705 R706 R707 R708 R709 R723 R724 R725 R726 R727: Spec="47k 0402"
  R710: Spec="10k 0402 (GPIO pull-up: reset follows RESETSTATz by default)"
  R711: Spec="1k 0402 (RST_n link, see note)"
  R712: Spec="10k 0402 (CLK pull-down, at pin 8)"
  R713: Spec="10k 0402 (strobe pull-down)"
  R720: Spec="4.7k 0402 (SD power follows RESETSTATz)"
  R721: Spec="10k 0402 (RT1 rise time)"
  R722: Spec="10k 0402 (RT2 rise time)"
  R728: DNP=1, Spec="47k 0402 (DNP)"
  R730: Spec="100R 0402 (SDCD series)"
  R731: Spec="47k 0402 (SDCD pull-up)"
  R732: Spec="10k 0402 (CLK pull-down, Octavo 62_SD_10)"
  R800 R801 R802 R803 R804 R805: Spec="22R 0402 (at SoC)"
  R806 R807 R808 R809 R810 R811: Spec="22R 0402 (at PHY)"
  R812: Spec="11k 1% 0402 (RBIAS)"
  R813: Spec="2.2k 0402 (MDIO pull-up)"
  R814: Spec="2.2k 0402 (INT open drain)"
  R815: Spec="1.5k 0402 (reset follows RESETSTATz)"
  R820: Spec="5.76k 1% 0402 (Rhi RX_CTRL mode 3)"
  R821: Spec="2.49k 1% 0402 (Rlo RX_CTRL mode 3)"
  R822: Spec="10k 1% 0402 (Rhi LED_1 mode 2)"
  R823: Spec="2.49k 1% 0402 (Rlo LED_1 mode 2)"
  R840: Spec="470R 0402 (green = LED_0 link)"
  R841: Spec="470R 0402 (yellow = LED_1 1000M)"
  R902 R910: Spec="3.48k 1% 0402"
  R903 R911: Spec="16.5k 1% 0402"
  R905: DNP=1, Spec="10k 0402 DNP (device-only port)"
  R906: Spec="1.5k 0402 (holds hub in reset while SoC pads are off)"
  R907: Spec="3.9k 0402 (PGANG low = independent OC)"
  R908 R909: Spec="10k 0402 (TPS2051B OC pull-up)"
  R913: Spec="100k 0402 (keeps USB-A power off while the SoC IO is unpowered; DNP only for USB1 deep-sleep wake)"
  R1000: Spec="22R 0402 (IDCK series, place at SoC ball T26)"
  R1001: Spec="10k 0402 (ISEL=0: I2C off, strap mode)"
  R1002: Spec="10k 0402 (BSEL=1: 24-bit single edge)"
  R1003: Spec="10k 0402 (DSEL=0: don't care at VREF=DVDD)"
  R1004: Spec="10k 0402 (EDGE=0: latch on IDCK falling edge)"
  R1005: Spec="10k 0402 (DKEN=0: de-skew off)"
  R1006: Spec="10k 0402 (TFP410 powered down in reset)"
  R1007: Spec="5.1k 0402 (MSEN open-drain pull-up, DS: 5k)"
  R1008: Spec="510R 1% 0402 (RTFADJ: 500 mV DVI swing)"
  R1009: Spec="10k 0402 (5 V switch + HPD off in reset)"
  R1010: Spec="10k 0402 (DDC level shifter off in reset)"
  R1011: Spec="100k 0402 (defines HPD while CT_HPD = 0)"
  R1012: DNP=1, Spec="10k 0402 DNP (EDGE=1 option; remove R1004)"
  R1013: DNP=1, Spec="10k 0402 DNP (DKEN=1 option; remove R1005)"
  R1014: DNP=1, Spec="10k 0402 DNP (DK3=1)"
  R1015: DNP=1, Spec="10k 0402 DNP (DK2=1)"
  R1016: DNP=1, Spec="10k 0402 DNP (DK1=1)"
  R1100 R1101: Spec="2.2k 0402 (I2C1 pull-up)"
  R1102: Spec="47R 0402 (series, SK R759 practice)"
  R1103: Spec="47R 0402 (series, SK R760 practice)"
  R1104: Spec="22R 0402 (source series, at Y1100)"
  R1105: Spec="2.2k 0402 (MICBIAS feed)"
  R1106: Spec="10k 0402 (OE high = run, SK R425)"
  R1107: Spec="10k 0402 (MCLK pull-down, SK D-note)"
  R1108: Spec="10k 0402 (codec held in reset)"
  R1109 R1110 R1111: Spec="100k 0402 (pad off in SoC reset)"
  R1112: Spec="100k 0402 (codec DOUT Hi-Z in reset)"
  R1200 R1201: Spec="2.2k 0402 (I2C2 pull-up)"
  R1202: Spec="10k 0402 (camera off in reset)"
  R1312: Spec="2.2k 0402 (beats the card's 10k pull-up: 0.33 V)"
  R1316: Spec="33R 0402 (SK R24)"
  R1319: Spec="100k 0402 (VIO_CFG weak pull-up, M.2 3.1.15)"
  R1428 R1429: Spec="1.8k 1% 0402 (RPi I2C1 value)"
  R1430 R1431: Spec="3.9k 1% 0402 (HAT ID bus)"
  R1432: DNP=1, Spec="1k 1% 0402 (WP pull-up, DNP)"
  R1433: Spec="47k 1% 0402 (UART5 RX idle high, Octavo 62_UART_2)"
  R1500 R1501: Spec="5.1k 1% 0402 (Rd, UFP)"
  R1503: Spec="12k 1% 0402 (REF)"
  R1504: Spec="1k 1% 0402 (RESET# pull-up)"
  R1505: Spec="10k 1% 0402 (OE# pull-up)"
  R1507: Spec="2.2k 1% 0402"
  R1511 R1513 R1515 R1517: Spec="10k 1% 0402 (SoC RXD pull-up)"
  R1512 R1514 R1516 R1518: Spec="10k 1% 0402 (SoC TXD pull-up)"
  R1520: Spec="22R 1% 0402 (TDO, near SoC)"
  R1521: Spec="22R 1% 0402 (RTCK loopback)"
  R1522: Spec="100R 1% 0402 (VTref current limit)"
  R1528: Spec="4.7k 1% 0402 (TRSTn pull-down)"
  R1529: DNP=1, Spec="4.7k 0402 DNP (sheet 06 R604 already pulls SRST up)"
  R1600: Spec="10k 1% 0402 (A0 = 1 -> 0x51)"
  R1601: DNP=1, Spec="10k 1% 0402 DNP (fit instead of R1600 for 0x50)"
  R1602: Spec="10k 1% 0402 (WP low = writable, as SK)"
  R1603: DNP=1, Spec="10k 1% 0402 DNP (write-protect: fit instead of R1602)"
  R1604: Spec="10k 1% 0402 (ALERT open drain)"
  R1605: Spec="2.2k 1% 0402 (I2C0 SCL pull-up)"
  R1606: Spec="2.2k 1% 0402 (I2C0 SDA pull-up)"
  R1607: Spec="330R 1% 0402 (power LED)"
  R1608: Spec="330R 1% 0402 (heartbeat, ~1.5 mA)"
  R1609: Spec="1k 1% 0402 (user 2, ~1.3 mA)"
  R1610: Spec="1k 1% 0402 (5 V present, ~3 mA)"
  R1620 R1621: Spec="47R 1% 0402 (series at the SoC ball, SK p.44)"
R301: library part RES, "Resistor", LCSC=C25893, Manufacturer=UNI-ROYAL, MPN=0402WGF4022TCE, Spec="40.2k 1% 0402 (R2)"
R302: library part RES, "Resistor", LCSC=C25902, Manufacturer=UNI-ROYAL, MPN=0402WGF4871TCE, Spec="4.87k 1% 0402 (R1)"
R1305 R1306 R1307 R1308 R1309 R1322 R1323: library part RES, "Resistor", LCSC=C25792, Manufacturer=UNI-ROYAL, MPN=0402WGF4702TCE
  R1305 R1306 R1307 R1308 R1309: Spec="47k 0402 (SDIO pull-up)"
  R1322: Spec="47k 0402 (UART6 RXD pull-up, 62_UART_2)"
  R1323: Spec="47k 0402 (UART6 CTSn pull-up)"
R1310 R1311 R1315 R1317: library part RES, "Resistor", LCSC=C25744, Manufacturer=UNI-ROYAL, MPN=0402WGF1002TCE
  R1310: Spec="10k 0402 (SK R12, clock low while pad is off)"
  R1311: Spec="10k 0402 (card IRQ is open drain, SK R6)"
  R1315: Spec="10k 0402 (W_DISABLE2#: BT off by default)"
  R1317: Spec="10k 0402 (card IRQ_BLE open drain)"
R1400 R1401 R1402 R1403 R1404 R1405 R1406 R1407 R1408 R1409 R1410 R1411 R1412 R1413 R1414 R1415 R1416 R1417 R1418 R1419 R1420 R1421 R1422 R1423: library part RES, "Resistor", Manufacturer=UNI-ROYAL, MPN=0402WGF330JTCE, Spec="33R 1% 0402"
R1424 R1425 R1426 R1427: library part RES, "Resistor", Manufacturer=UNI-ROYAL, MPN=0402WGF620JTCE, Spec="62R 1% 0402 (slew limiter)"
SW200 SW600 SW601: library part TS-1187A, "Tactile switch SPST-NO 5.1x5.1 mm, 4 terminals (A=B, C=D)", Manufacturer="XKB Connection", MPN=TS-1187A-B-A-B
SW602: library part DIPSW4_SMD, "DIP switch 4-position SPST, 2.54 mm SMD (pos k = pins k / 9-k)", Manufacturer="SHOU HAN", MPN="2.54-4P TPGT"
TP100 TP101 TP102 TP103 TP104 TP105 TP200 TP201 TP202 TP203 TP204 TP300 TP301 TP302 TP303 TP304 TP305 TP306 TP307 TP308 TP309 TP310 TP311 TP312 TP600 TP601 TP602 TP603 TP604 TP605 TP606 TP1000 TP1001 TP1300 TP1301 TP1400 TP1500 TP1600 TP1601 TP1602: library part TESTPOINT, "Test point"
U1: "Octavo OSD6254 SiP: TI AM6254 + 1 GB DDR4, 9x14 mm 500-ball 0.5 mm BGA", Manufacturer="Octavo Systems", MPN=OSD6254-1G-IPM
U100: library part TPS25730D_REF, "TPS25730D USB-C PD sink controller, 5 A integrated power path, WQFN-38 REF", Manufacturer="Texas Instruments", MPN=TPS25730DREFR
U101: library part LM61460_RJR, "LM61460 36 V 6 A synchronous buck, adjustable, VQFN-HR-14 RJR", Manufacturer="Texas Instruments", MPN=LM61460AANRJRR
U102: library part TPS63070_RNM, "TPS63070 2-16 V 3.6 A buck-boost, adjustable, VQFN-HR-15 RNM", Manufacturer="Texas Instruments", MPN=TPS63070RNMR
U200: library part TPS65219, "TPS65219 PMIC, 3 bucks + 4 LDOs, VQFN-32 RHB/RSM (NVM per OPN)", Manufacturer="Texas Instruments", MPN=TPS6521904RSMR
U201: library part TPS22965_DSG, "TPS22965 5.7 V 4 A load switch with controlled rise time, WSON-8", Manufacturer="Texas Instruments", MPN=TPS22965DSGR
U202: library part TLV755P_DBV, "TLV755P 500 mA LDO, SOT-23-5 (fixed output per OPN)", Manufacturer="Texas Instruments", MPN=TLV75518PDBVR, DNP=1
U203: library part TLV755P_DBV, "TLV755P 500 mA LDO, SOT-23-5 (fixed output per OPN)", Manufacturer="Texas Instruments", MPN=TLV75710PDBVR
U600: library part ECS-2520MV, "25 MHz HCMOS oscillator 1.6-3.6 V, 2.5x2.0 mm SMD-4", Manufacturer="ECS Inc", MPN=ECS-2520MV-250-CN-TR
U601: library part SN74LVC1G11_DCK, "Single 3-input AND gate, SC70-6", LCSC=C282348, Manufacturer=Nexperia, MPN=74LVC1G11GW,125, Supplier="Mouser 771-LVC1G11GW125"
U602: library part SN74LVC2G17_DBV, "Dual Schmitt-trigger buffer, SOT-23-6", Manufacturer="Texas Instruments", MPN=SN74LVC2G17DBVR
U700: library part TPS22996_DRL, "TPS22996 dual 4 A load switch with QOD and ON-current set rise time, SOT-583-8", Manufacturer="Texas Instruments", MPN=TPS22996DRLR
U701 U702 U1510 U1511: library part TPD4E05U06_DQA, "4-channel 0.5 pF ESD array, USON-10", Manufacturer="Texas Instruments", MPN=TPD4E05U06DQAR
U703: library part SN74LVC1G08_DBV, "Single 2-input AND gate, SOT-23-5", LCSC=C7666, Manufacturer="Texas Instruments", MPN=SN74LVC1G08DBVR
U800: library part DP83867_RGZ, "DP83867IS/E/CS 10/100/1000 Ethernet PHY, RGMII/SGMII, VQFN-48 RGZ", LCSC=C543036, Manufacturer="Texas Instruments", MPN=DP83867ISRGZR
U900: "WCH CH335F USB 2.0 HS 4-port MTT hub, per-port power/OC, QFN-28 4x4", LCSC=C5137013, Manufacturer="WCH (Jiangsu Qin Heng)", MPN=CH335F
U901 U902: library part TPS2051B_DBV, "TPS2051B 0.5 A USB power switch, active-high EN, OC flag, SOT-23-5", LCSC=C24593, Manufacturer="Texas Instruments", MPN=TPS2051BDBVR
U1000: library part TFP410_PAP, "TI TFP410 DVI 1.0 transmitter, 24-bit DPI in, HTQFP-64 PowerPAD", Manufacturer="Texas Instruments", MPN=TFP410PAPR
U1001: library part TPD12S016_PW, "TI TPD12S016 HDMI companion: 5 V load switch, DDC/CEC/HPD level shift, 12-ch ESD, TSSOP-24", Manufacturer="Texas Instruments", MPN=TPD12S016PWR
U1100: library part TLV320AIC3104_RHB, "TI TLV320AIC3104 low-power stereo codec, I2S + I2C, VQFN-32", Manufacturer="Texas Instruments", MPN=TLV320AIC3104IRHBR
U1400: library part BL24C32A_TSSOP8, "BL24C32A 32 Kbit I2C EEPROM (2-byte address), TSSOP-8", Manufacturer="Shanghai Belling", MPN=BL24C32A-SFRC, DNP=1
U1500: library part FT4232HL, "FT4232H quad Hi-Speed USB to UART/MPSSE, LQFP-64", Manufacturer=FTDI, MPN=FT4232HL-REEL
U1501: library part TPD2E001_DRL, "2-channel USB ESD array with VCC clamp rail, SOT-5 (DRL)", Manufacturer="Texas Instruments", MPN=TPD2E001DRLR
U1502: library part AP2112K_SOT25, "AP2112K 600 mA CMOS LDO, fixed output, SOT-23-5", Manufacturer="Diodes Incorporated", MPN=AP2112K-3.3TRG1
U1503: library part 93LC46B_OT, "93LC46B 1 Kbit Microwire EEPROM (64 x 16), SOT-23-6", Manufacturer=Microchip, MPN=93LC46BT-I/OT
U1504 U1505: library part SN74AVC4T245_PW, "Dual 2-bit dual-supply bus transceiver, Ioff + VCC isolation, TSSOP-16", Manufacturer="Texas Instruments", MPN=SN74AVC4T245PWR
U1600: library part AT24C512C_SOIC8, "512 Kbit I2C EEPROM, SOIC-8 (SSHD: 2.5-5.5 V)", Manufacturer=Microchip, MPN=AT24C512C-SSHD-T
U1601: library part TMP102_DRL, "TMP102 digital temperature sensor, I2C, SOT-563", Manufacturer="Texas Instruments", MPN=TMP102AIDRLR
Y600: library part XTAL2, "Crystal, 2-terminal", Manufacturer="Seiko Epson", MPN=Q13FC13500003, Spec="32.768kHz 9pF 20ppm Q13FC13500003"
Y800: library part XTAL4_3225, "Crystal, 3.2x2.5 mm, 4 pads (1/3 crystal, 2/4 case GND)", LCSC=C9006, Manufacturer=YXC, MPN=X322525MOB4SI, Spec="X322525MOB4SI 25MHz 12pF 10ppm"
Y900: library part XTAL_YSX321SL, "Crystal 3.2x2.5 mm 4-pad, YXC YSX321SL (1/3 crystal, 2/4 GND)", Manufacturer="Diodes Incorporated", MPN=FL1200074, Spec="FL1200074 12MHz 20pF 20ppm", Supplier="Digi-Key FL1200074"
Y1100: library part OSC_3225_OE, "LVCMOS oscillator with output enable, 3.2x2.5 mm 4-pad", Manufacturer="KYOCERA AVX", MPN=MC3225Z12.2880C19XSH, Spec="MC3225Z12.2880C19XSH 12.288MHz", Supplier="Digi-Key MC3225Z12.2880C19XSH"
Y1500: library part X322512MSB4SI, "Crystal 3225 4-pad (1/3 crystal, 2/4 case GND)", Manufacturer="Diodes Incorporated", MPN=FL1200074, Spec="12MHz FL1200074", Supplier="Digi-Key FL1200074"

## Via types
v1: diameter 19.68, hole 11.81, L1_TOP to L8_BOT, 865 vias
v2: diameter 9.84, hole 5.91, L1_TOP to L8_BOT, 246 vias
v3: diameter 15.75, hole 7.87, L1_TOP to L8_BOT, 125 vias
v4: diameter 13.78, hole 7.87, L1_TOP to L8_BOT, 18 vias

## Nets (pads, with @x,y where several pads share a name; then routed paths per layer and width w, separated by ;. In a path a pad name is that pad's centre, name@x,y a point inside that pad or via, vN(x,y) a via of type N, cw(c..) or ccw(c..) an arc to the next point about the centre after c; other vN are vias at no path point)
AUD_BCLK: R1109.1 U1.J26 U1100.2 | length 1786.2
  L1_TOP w3.54: U1.J26@2273.62,1781.5 v2(2283.46,1791.34)
  L1_TOP w5.91: v3(2660,2076.77) 2669.69,2067.71 3142.1,2067.71 3148.42,2074.04 3172.96,2074.04 3185.32,2086.4 3226.4,2086.4 3285,2145 3489.33,2145 3543.03,2198.7 R1109.1@3600,2198.7 ; R1109.1@3600,2200 3620,2200 3659.45,2239.45 U1100.2@3659.45,2366.14
  L8_BOT w5.91: v2(2283.46,1791.34) v2(2283.46,1791.34) 2293.24,1801.05 2301.05,1801.05 2310,1810 2310,1888.36 2346.09,1924.45 2374.02,1924.45 2408.29,1924.45 2410.49,1922.24 2472.69,1922.24 2476.96,1926.52 2484.71,1934.27 2484.71,1937.58 2492.13,1953.47 2509.48,1990.65 2513.29,1994.47 2513.29,1998.83 2526.58,2027.3 2532.48,2047.5 2561.75,2076.77 v3(2660,2076.77)
AUD_DIN: R1112.1 U1.H25 U1100.5 | length 362.8
  L1_TOP w3.54: U1.H25@2253.94,1801.18 v2(2263.78,1791.34)
  L1_TOP w5.91: U1100.5@3718.5,2366.14 3718.5,2289.58 3731.3,2276.78 R1112.1@3731.3,2275 3731.3,2274.02 3750.8,2254.51 3780.49,2254.51 3795,2240 3795,2185 3750,2140 3750,2085
AUD_DOUT: R1111.1 U1.J25 U1100.4 | length 1187.3
  L1_TOP w3.54: v2(2244.09,1791.34) U1.J25@2253.94,1781.5
  L1_TOP w5.91: 2844.03,2005 3575,2005 3735,2165 3735,2200.32 3701.3,2234.02 3701.3,2356.77 3698.82,2359.25 U1100.4@3698.82,2366.14
AUD_FSYNC: R1110.1 U1.L25 U1100.3 | length 1889.7
  L1_TOP w3.54: U1.L25@2253.94,1742.13 v2(2263.78,1732.28)
  L1_TOP w5.91: v3(2655,2055) 2662.4,2051 3221,2051 3285.16,2115.16 3610.16,2115.16 3671.3,2176.3 R1110.1@3671.3,2195 ; 3670,2205 3670,2206.78 3679.13,2215.92 U1100.3@3679.13,2366.14
  L8_BOT w3.54: v2(2263.78,1732.28) 2276.06,1720 2297.92,1720 2300,1722.08 2300,1725 2310,1735
  L8_BOT w5.91: 2310,1735 2310,1780 2329.58,1799.58 2329.58,1892.97 2349.16,1912.55 2352.45,1912.55 2352.6,1912.4 2374.02,1912.4 2476.77,1912.4 2501.97,1937.6 2501.97,1946.03 2513.46,1957.52 2541.53,1957.52 2638.27,2054.26 2654.26,2054.26 v3(2655,2055)
AUD_HP_L: C1111.2 D1100.1 J1100.2 | length 153.3
  L1_TOP w5.12: C1111.2@4214.16,2678.18 4238.95,2678.18 4242.13,2675 ; D1100.1@4242.13,2624.02 4242.13,2675 ; J1100.2@4242.13,2748.03 4242.13,2675
AUD_HP_R: C1112.2 D1101.1 J1100.3 | length 923.9
  L1_TOP w5.12: C1112.2@3659.45,2955.51 3666.34,2948.62 3915.9,2948.62 3959.01,2905.51 J1100.3@4242.13,2905.51 4227.64,2905.51 4207.28,2885.15 4207.28,2822.28 4180,2795 4180,2627.33 4176.68,2624.02 D1101.1@4173.23,2624.02
AUD_HPLOUT: C1111.1 U1100.19 | length 590
  L1_TOP w5.12: U1100.19@3738.19,2555.12 3737.6,2555.71 3737.6,2697.6 3780,2740 4029.98,2740 4091.81,2678.18 C1111.1@4141.72,2678.18
AUD_HPROUT: C1112.1 U1100.23 | length 355.7
  L1_TOP w7.87: U1100.23@3659.45,2555.12 3659.45,2610.55 3630,2640 3630,2853.62 3639.23,2862.85 3639.23,2868.53 3653.77,2883.07 C1112.1@3659.45,2883.07
AUD_I2C_SCL: R1102.2 U1100.8 | length 52.8
  L1_TOP w5.91: U1100.8@3777.56,2366.14 3781.83,2361.87 v3(3781.83,2337.58) 3782.23,2337.98 3803.6,2337.98 R1102.2@3803.99,2338.37
AUD_I2C_SDA: R1103.2 U1100.9 | length 45.9
  L1_TOP w5.91: U1100.9@3803.15,2391.73 3804.08,2392.66 3847.35,2392.66 R1103.2@3848.29,2393.6
AUD_MCLK: R1104.2 R1107.1 U1.G26 U1100.1 | length 194.7
  L1_TOP w3.54: v2(2263.78,1811.02) U1.G26@2273.62,1820.87
  L1_TOP w5.91: R1107.1@3520,2406.3 3520.98,2406.3 3561.14,2366.14 U1100.1@3639.76,2366.14 3637.8,2364.17 3637.8,2326.5 R1104.2@3635,2323.7
AUD_MCLK_OSC: R1104.1 Y1100.3 | length 69.2
  L1_TOP w5.91: Y1100.3@3583.31,2328.46 3591.05,2328.46 3630.72,2288.8 3632.5,2288.8 R1104.1@3635,2286.3
AUD_MIC: C1113.1 D1102.1 J1100.1 R1105.2 U1100.14 | length 599.1
  L1_TOP w5.12: U1100.14@3803.15,2490.16 3905.16,2490.16 3995,2580 3995,2696.86 4006.8,2708.66 4027.16,2688.3 4027.16,2687.4 4090.55,2624.02 D1102.1@4094.49,2624.02 ; C1113.1@3875,2703.9 3981.46,2703.9 J1100.1@3986.22,2708.66
AUD_MIC_IN: C1113.2 U1100.16 | length 176
  L1_TOP w5.12: U1100.16@3803.15,2529.53 3826.72,2529.53 3865,2567.81 C1113.2@3865,2666.1
AUD_MICBIAS: R1105.1 U1100.15 | length 226.9
  L1_TOP w5.12: U1100.15@3803.15,2509.84 3854.84,2509.84 3900,2555 R1105.1@3900,2666.3
AUD_OSC_OE: R1106.2 Y1100.1 | length 52.4
  L1_TOP w5.91: Y1100.1@3511.69,2266.54 3513.7,2264.53 R1106.2@3513.7,2215
AUD_RST_N: R1108.1 U1.T25 U1100.31 | length 75.2
  L1_TOP w3.54: v2(2244.09,1633.86) U1.T25@2253.94,1643.7
  L1_TOP w7.87: R1108.1@3555,2406.3 3556.25,2406.3 3561.37,2411.42 U1100.31@3614.17,2411.42
BB_FB: R123.2 R124.1 U102.5
BB_L1: L101.1 U102.11 | length 176.1
  L1_TOP w19.68: U102.11@955.71,1003.94 U102.11@959.65,1007.87
  L1_TOP w23.62: U102.11@959.65,1007.87 1058.07,1007.87 1105.32,1055.12 L101.1@1110.24,1057.09
BB_L2: L101.2 U102.9 | length 176.1
  L1_TOP w19.68: U102.9@955.71,964.57 U102.9@959.65,960.63
  L1_TOP w23.62: U102.9@959.65,960.63 1058.07,960.63 1105.32,913.39 L101.2@1110.24,911.42
BB_PS_SYNC: R122.2 U102.1
BB_VAUX: C124.1 U102.3
BOOT_SW3: R644.1 SW602.8
BOOT_SW4: R646.1 SW602.7
BOOT_SW5: R648.1 SW602.6
BOOT_SW6: R650.1 SW602.5
BOOTMODE00: R620.2 R621.1 U1.G28 | length 35
  L1_TOP w3.54: U1.G28@2312.99,1820.87 2348.04,1820.87
BOOTMODE01: R622.2 R623.1 U1.G27 | length 63.1
  L1_TOP w3.54: U1.G27@2293.31,1820.87 2303.15,1830.71 2352.36,1830.71
BOOTMODE02: R624.2 R625.1 U1.F28 | length 39.4
  L1_TOP w3.54: U1.F28@2312.99,1840.55 2352.36,1840.55
BOOTMODE03: R644.2 R645.1 U1.F27 | length 63.1
  L1_TOP w3.54: U1.F27@2293.31,1840.55 2303.15,1850.39 2352.36,1850.39
BOOTMODE04: R646.2 R647.1 U1.E28 | length 39.4
  L1_TOP w3.54: U1.E28@2312.99,1860.24 2352.36,1860.24
BOOTMODE05: R648.2 R649.1 U1.E27 | length 63.1
  L1_TOP w3.54: U1.E27@2293.31,1860.24 2303.15,1870.08 2352.36,1870.08
BOOTMODE06: R650.2 R651.2 U1.D28 | length 39.4
  L1_TOP w3.54: U1.D28@2312.99,1879.92 2352.36,1879.92
BOOTMODE07: R626.2 R627.1 U1.D27 | length 63.7
  L1_TOP w3.54: U1.D27@2293.31,1879.92 2303.15,1889.76 2345.88,1889.76 2347.2,1888.45 2352.36,1888.45
BT_EN: J1300.54 R1315.1 U1.C25 | length 13.9
  L1_TOP w3.54: v2(2244.09,1909.45) U1.C25@2253.94,1899.61
BT_UART_CTS_N: J1300.34 R1323.2 U1.C28 | length 1079.4
  L1_TOP w3.54: U1.C28@2312.99,1899.61 2350.51,1899.61 v2(2351.44,1898.68)
  L8_BOT w5.91: v2(2351.44,1898.68) 2352.19,1899.43 2359.43,1899.43 2360,1900 2374.02,1900 2421.33,1900 2423.88,1902.56 2480.84,1902.56 2483.29,1905 2492.13,1905 2520.42,1905 2571.85,1956.43 2587.34,1956.43 R1323.2@2589.57,1958.66 ; R1323.2@2589.57,1959.65 2652.24,2022.32 2697.32,2022.32 2755,2080 2755,2422.03 2885.14,2552.17 2887.01,2552.17 2893.9,2559.06 J1300.34@2918.5,2559.06
BT_UART_RTS_N: J1300.36 U1.C27 | length 1130.5
  L1_TOP w3.54: U1.C27@2293.31,1899.61 2303.15,1909.45 2352.36,1909.45
  L1_TOP w5.91: 2352.36,1909.45 2374.02,1909.45 2420.55,1909.45 2428.12,1901.88 2428.12,1889.68 v3(2430,1887.79)
  L8_BOT w5.91: v3(2430,1887.79) 2489.92,1887.79 2492.13,1890 2520,1890 2546.34,1916.34 2636.34,1916.34 2785,2065 2785,2425 2881.1,2521.1 2881.1,2528.44 2885.14,2532.48 2887.01,2532.48 2893.9,2539.37 J1300.36@2918.5,2539.37
BT_UART_RXD: J1300.22 R1322.2 U1.B26 | length 1306.7
  L1_TOP w3.54: 2263.78,1978.35 2263.78,1929.13 U1.B26@2273.62,1919.29
  L1_TOP w5.91: 2263.78,1978.35 2271.29,1985.86 2374.02,1985.86 2483.8,1985.86 v3(2498.53,2000.58)
  L8_BOT w5.91: v3(2498.53,2000.58) 2493.97,2000.58 2492.5,2002.06 2492.5,2019.07 R1322.2@2510.83,2037.4 2510.83,2425.83 2520,2435 2520,2520 2615,2615 2831.73,2615 2893.9,2677.17 J1300.22@2918.5,2677.17
BT_UART_TXD: R1316.1 U1.B27 | length 13.9
  L1_TOP w3.54: U1.B27@2293.31,1919.29 v2(2303.15,1929.13)
CAM_FPC_IO1: J1200.12 | length 147.6
  L1_TOP w5.94: J1200.12@2512.48,215.43 J1200.12@2512.48,363.07
CAM_I2C_SCL: J1200.13 R1200.2 U1.E26 | length 169.5
  L1_TOP w3.54: U1.E26@2273.62,1860.24 v2(2283.46,1870.08)
  L1_TOP w5.94: J1200.13@2551.85,215.43 2551.85,266.33 2542.31,275.88 2542.31,331.27 2551.85,340.81 J1200.13@2551.85,363.07
CAM_I2C_SDA: J1200.14 R1201.2 U1.E25 | length 161.6
  L1_TOP w3.54: U1.E25@2253.94,1860.24 v2(2263.78,1870.08)
  L1_TOP w5.94: J1200.14@2591.22,215.43 J1200.14@2591.22,363.07
CAM_IO0: J1200.11 R1202.1 U1.R24 | length 1774
  L1_TOP w3.54: v2(2224.41,1673.23) U1.R24@2234.25,1663.39
  L1_TOP w3.94: J1200.11@2473.11,215.43 J1200.11@2473.11,363.07
  L1_TOP w5.12: 2480.32,91.54 2482.97,88.88 2482.97,42.03 v3(2485,40)
  L1_TOP w5.91: v3(2472.52,421.87) 2473.11,421.28 J1200.11@2473.11,363.07
  L3_SIG w3.94: v2(2224.41,1673.23) 2252.64,1645 2345,1645
  L3_SIG w5.91: 2345,1645 2348.17,1641.83 2348.17,1614.32 2343.58,1609.73 2343.58,1568.58 2318.31,1543.31 2315,1540 2315,1425.2 2315,1410.88 2319.76,1406.12 2319.76,1393.88 2315,1389.12 2315,1172.68 2282.48,1140.16 2282.48,1025.19 2292.32,1015.35 2292.32,602.07 v3(2472.52,421.87)
  L8_BOT w5.12: R1202.1@2480,71.3 2485,66.3 v3(2485,40)
CAM_IO1: U1.E1 | length 39.4
  L1_TOP w3.54: 1742.13,1860.24 U1.E1@1781.5,1860.24
CSI_CLK_N: J1200.8 U1.V17 | length 1517.7
  L1_TOP w3.54: U1.V17@2096.46,1604.33 2096.46,1570.43 2121.88,1545
  L1_TOP w5.12: 2121.88,1545 2121.88,1225.31 2147.81,1199.39 2279.6,1067.6 2279.6,763.44 2368.13,674.91 2368.13,395.99 2355,382.86 J1200.8@2355,363.07 2355,343.28 2368.13,330.15 2368.13,252.29 2355,239.16 J1200.8@2355,215.43
CSI_CLK_P: J1200.9 U1.U17 | length 1542.9
  L1_TOP w3.54: U1.U17@2096.46,1624.02 2106.89,1613.58 2106.89,1573.11 2135,1545
  L1_TOP w5.12: 2135,1545 2135,1230.75 2292.72,1073.03 2292.72,768.87 2381.24,680.35 2381.24,395.99 2394.37,382.86 J1200.9@2394.37,363.07 2394.37,343.28 2381.24,330.15 2381.24,252.29 2394.37,239.16 J1200.9@2394.37,215.43
CSI_D0_N: J1200.2 U1.V16 | length 1441.8
  L1_TOP w3.54: 2063.76,1543.31 2063.76,1548.09 2064.91,1549.23 2064.91,1560.73 2075.63,1571.44 2076.77,1572.59 U1.V16@2076.77,1604.33 ; J1200.2@2118.78,215.43 2118.78,237.8 2129.77,248.79 2130.62,248.79 2132.69,250.87 2132.69,331.57 2130.62,333.65 2129.77,333.65 2118.78,344.64 J1200.2@2118.78,363.07
  L1_TOP w5.12: 2063.76,1543.31 2063.76,1431.42 2062.98,1430.63 2062.98,1179.47 2062.19,1178.68 2062.19,1167.81 2066.03,1163.97 2131.91,1098.09 2131.91,395.99 2118.78,382.86 J1200.2@2118.78,363.07
CSI_D0_P: J1200.3 U1.U16 | length 1465.3
  L1_TOP w3.54: 2075.31,1543.31 2075.31,1548.09 2074.16,1549.23 2074.16,1556.9 2084.88,1567.61 2086.02,1568.76 2086.02,1614.76 U1.U16@2076.77,1624.02 ; J1200.3@2158.15,215.43 2158.15,237.8 2147.16,248.79 2146.31,248.79 2144.24,250.87 2144.24,331.57 2146.31,333.65 2147.16,333.65 2158.15,344.64 J1200.3@2158.15,363.07
  L1_TOP w5.12: 2075.31,1543.31 2075.31,1431.42 2076.09,1430.63 2076.09,1174.03 2075.31,1173.24 2145.02,1103.53 2145.02,395.99 2158.15,382.86 J1200.3@2158.15,363.07
CSI_D1_N: J1200.5 U1.V15 | length 1960.6
  L1_TOP w3.54: 2050,1543.31 2048.66,1544.65 2048.66,1556.95 2050.73,1559.03 2050.97,1559.03 2057.09,1565.14 U1.V15@2057.09,1604.33
  L1_TOP w5.12: 2050,1543.31 2050,1525 2023.12,1498.12 2023.12,1027.32 2090,960.43 2090,753.44 2030,693.44 2030,160 2050,140 2217.08,140 2250.02,172.93 2250.02,178.58 2236.89,191.7 J1200.5@2236.89,215.43 2236.89,239.16 2250.02,252.29 2250.02,330.15 2236.89,343.28 J1200.5@2236.89,363.07
CSI_D1_P: J1200.6 U1.U15 | length 2028.1
  L1_TOP w3.54: 2036.88,1543.31 2038.22,1544.65 2038.22,1561.27 2046.41,1569.46 2046.65,1569.46 2046.65,1613.58 U1.U15@2057.09,1624.02
  L1_TOP w5.12: 2036.88,1543.31 2036.88,1530.43 2010,1503.55 2010,1021.88 2076.88,955 2076.88,758.87 2016.88,698.87 2016.88,154.57 2044.57,126.88 2222.52,126.88 2263.13,167.5 2263.13,178.58 2276.26,191.7 J1200.6@2276.26,215.43 2276.26,239.16 2263.13,252.29 2263.13,330.15 2276.26,343.28 J1200.6@2276.26,363.07
DBG_MAIN_UART0_RXD: R1511.2 U1.A10 U1504.13 | length 1152.6
  L1_TOP w3.54: U1.A10@1958.66,1938.98 1958.66,1978.35
  L1_TOP w5.91: U1504.13@1295.28,2524.61 1343.6,2524.61 1406.5,2461.71 1406.5,2458.93 1411.69,2453.74 1566,2453.74 1577.81,2441.93 1592.11,2441.93 1619.35,2414.69 1629.69,2414.69 1694.76,2479.76 2070.96,2479.76 2073.56,2482.37 2085.79,2482.37 2093.17,2474.99 ; 2093.19,2474.96 ccw(c2097.34,2479.16) 2094.55,2473.96 ; 2094.59,2473.94 2101.06,2473.94 v3(2125,2450)
  L8_BOT w5.91: R1511.2@2074.8,2312.01 2074.62,2312.01 2068.82,2317.8 2068.82,2329.54 2058.07,2340.29 2058.07,2345.85 2050,2353.92 2050,2361.54 2063.46,2375 2090,2375 2125,2410 v3(2125,2450)
DBG_MAIN_UART0_TXD: R1512.2 U1.B10 U1504.11 | length 1001.5
  L1_TOP w3.54: 1948.82,1978.35 1948.82,1929.13 U1.B10@1958.66,1919.29